# EAGLE board sweef_platine_v5_ohne_masseflaeche (EAGLE 9.6.2)

Size 34.2 x 46.2 mm. Coordinates in mm from the lower left corner, seen from the top.
Outline: 5.6,0 28.6,0 arc90 29.6,1 29.6,8 33.2,8 arc90 34.2,9 34.2,45.2 arc90 33.2,46.2 1,46.2 arc90 0,45.2 0,9 arc90 1,8 4.6,8 4.6,1 arc90 5.6,0
Copper layers (1*16): Top 0.035mm / dielectric 1.5mm / Bottom 0.035mm
Design rules "Fusion Electronics Design Rules": minimum track width 6mil, minimum drill 0.35mm, track to track 6mil, track to pad 6mil, pad to pad 6mil, via to via 6mil, smd to smd 6mil, copper to edge 0.4mm, drill to drill 6mil, minimum pad ring 10mil, minimum via ring 8mil, stop-mask expansion 4mil, vias tented up to drill 9999mil, thermal gap 10mil
Net classes: 0 default: width 0.2 mm, drill 0.3 mm, clearance 0.15 mm; 1 Strom: width 0.3 mm, drill 0.3 mm, clearance 0.15 mm, clearance 0.15 mm to class 0
tRestrict: area 16.6,11.5 to 21.2,24; area -1,-1 to 5,8.4; area 29.2,-1 to 35.2,8.4; area -3,-3 to 0.4,49.2; area 33.8,-3 to 37.2,49.2; area -3,45.8 to 37.2,49.2; area -3,-3 to 37.2,0.4
bRestrict: area 16.6,11.5 to 21.2,24; area -1,-1 to 5,8.4; area 29.2,-1 to 35.2,8.4; area -3,-3 to 0.4,49.2; area 33.8,-3 to 37.2,49.2; area -3,45.8 to 37.2,49.2; area -3,-3 to 37.2,0.4
vRestrict: area 16.6,11.5 to 21.2,24; area -1,-1 to 5,8.4; area 29.2,-1 to 35.2,8.4; area -3,-3 to 0.4,49.2; area 33.8,-3 to 37.2,49.2; area -3,45.8 to 37.2,49.2; area -3,-3 to 37.2,0.4

## Footprints (pad centres in the part's own frame; a part is rotated, then mirrored left to right if it is on the bottom)
C0402 = smd 0.7 x 0.9: 1 -0.65,0; 2 0.65,0
0603-NO = smd 1.075 x 1: 1 -0.85,0; 2 0.85,0
0805-NO = smd 1.3 x 1.5: 1 -0.95,0; 2 0.95,0
SOD-123 = smd 1.2 x 0.7: A 1.85,0; C -1.85,0
PADS_2_AKKU = smd 2 x 1.8: 1 0,1.6; 2 0,-1.6
FPC-24_XUNPU_FPC-05FB-24PH20 = smd 0.3 x 1.2: 1 -5.75,-1.84; 2 -5.25,-1.84; 3 -4.75,-1.84; 4 -4.25,-1.84; 5 -3.75,-1.84; 6 -3.25,-1.84; 7 -2.75,-1.84; 8 -2.25,-1.84; 9 -1.75,-1.84; 10 -1.25,-1.84; 11 -0.75,-1.84; 12 -0.25,-1.84; 13 0.25,-1.84; 14 0.75,-1.84; 15 1.25,-1.84; 16 1.75,-1.84; 17 2.25,-1.84; 18 2.75,-1.84; 19 3.25,-1.84; 20 3.75,-1.84; 21 4.25,-1.84; 22 4.75,-1.84; 23 5.25,-1.84; 24 5.75,-1.84 | smd 2 x 1.8: MNT1@0 -7.3,1.41; MNT2@0 7.3,1.41
PADS_3_TASTER = smd 1.5 x 1.5: 1 -2.54,0; 2 0,0; 3 2.54,0
PADS_2_LS = smd 1.5 x 2: 1 -2,0; 2 2,0
INDUCTOR_3X3 = smd 2.7 x 0.8: P$1 0,1.1; P$2 0,-1.1
R0402 = smd 0.7 x 0.9: 1 -0.65,0; 2 0.65,0
TP_7 = smd 1.3 x 1.3: 1 -7.62,0; 2 -5.08,0; 3 -2.54,0; 4 0,0; 5 2.54,0; 6 5.08,0; 7 7.62,0
XIAO_NRF52840_SMD = smd 2.75 x 2: 1 -8.055,7.325; 2 -8.055,4.785; 3 -8.055,2.245; 4 -8.055,-0.295; 5 -8.055,-2.835; 6 -8.055,-5.375; 7 -8.055,-7.915; 8 8.11,-7.915; 9 8.11,-5.375; 10 8.11,-2.835; 11 8.11,-0.295; 12 8.11,2.245; 13 8.11,4.785; 14 8.11,7.325 | drill 0.9 pad 1.5: 19 -4.445,0.018; 20 -4.445,1.923
BMX280_COMBO = smd 0.725 x 0.35: 1 0.925,0.975; 2 0.925,0.325; 3 0.925,-0.325; 4 0.925,-0.975; 5 -0.925,-0.975; 6 -0.925,-0.325; 7 -0.925,0.325; 8 -0.925,0.975
MSOP8_0.65MM = smd 0.4 x 1.4: 1 -0.975,-2.2; 2 -0.325,-2.2; 3 0.325,-2.2; 4 0.975,-2.2; 5 0.975,2.2; 6 0.325,2.2; 7 -0.325,2.2; 8 -0.975,2.2
LGA12_2X2MM = smd 0.275 x 0.25: 1 -0.75,0.75; 2 -0.75,0.25; 3 -0.75,-0.25; 4 -0.75,-0.75; 7 0.75,-0.75; 8 0.75,-0.25; 9 0.75,0.25; 10 0.75,0.75 | smd 0.25 x 0.275: 5 -0.25,-0.75; 6 0.25,-0.75; 11 0.25,0.75; 12 -0.25,0.75
MSOP10 = smd 0.25 x 1: 1 -1,-2.113; 2 -0.5,-2.113; 3 0,-2.113; 4 0.5,-2.113; 5 1,-2.113; 6 1,2.113; 7 0.5,2.113; 8 0,2.113; 9 -0.5,2.113; 10 -1,2.113
SOT23-5 = smd 0.55 x 1.2: 1 -0.95,-1.3; 2 0,-1.3; 3 0.95,-1.3; 4 0.95,1.3; 5 -0.95,1.3

## Placement (x,y rotation side)
C10  100 nF  [C0402]  24.4,33 270 bottom
C20  4,7 uF  [0603-NO]  12.6,4 90 top
C21  4,7 uF  [0603-NO]  14.6,4 90 top
C22  4,7 uF 25 V  [0805-NO]  16.8,4 90 top
C23  4,7 uF  [0603-NO]  30,24 270 bottom
C24  4,7 uF 25 V  [0805-NO]  27.2,19.2 270 bottom
C30  100 nF  [C0402]  28.6,10 270 bottom
C31  220 nF  [C0402]  22.8,10 270 bottom
C32  100 nF  [C0402]  22.8,12.4 270 bottom
C33  10 uF  [0603-NO]  25.6,13.8 0 bottom
C40  33 nF  [C0402]  2.5,32.5 0 bottom
C41  1 uF  [C0402]  2.5,34 0 bottom
C42  1 uF  [C0402]  5.2,34 0 bottom
C43  1 uF  [C0402]  2,37.8 270 bottom
C44  10 uF  [0603-NO]  9.2,37.8 270 bottom
D1  B5819W  [SOD-123]  23.6,19.6 0 bottom
J1  Akku  [PADS_2_AKKU]  27.95,4 0 bottom
J2  Display-Stecker  [FPC-24_XUNPU_FPC-05FB-24PH20]  17.1,3.25 180 bottom
J3  Taster extern  [PADS_3_TASTER]  6.25,4 270 bottom
J5  Lautsprecher/Piezo  [PADS_2_LS]  4.3,44.85 0 bottom
L1  10 uH  [INDUCTOR_3X3]  23.4,23.6 0 bottom
R1  2,2 kR  [R0402]  29.4,14.6 0 bottom
R2  2,2 kR  [R0402]  29.4,16.2 0 bottom
R10  0,1 R 1 %  [0805-NO]  31.2,32 270 bottom
R20  910 kR  [R0402]  19,4 90 top
R21  100 kR  [R0402]  20.6,4 90 top
R22  1 MR  [R0402]  29.2,27.6 0 bottom
R23  105 kR  [R0402]  29.2,29 0 bottom
R24  100 kR  [R0402]  30,21.2 270 bottom
R30  1 kR  [R0402]  2.5,31 0 bottom
R31  10 kR  [R0402]  5.2,31 0 bottom
R32  10 kR  [R0402]  5.2,32.5 0 bottom
R33  100 kR  [R0402]  3,41.2 0 bottom
R34  0 R  [0603-NO]  6.6,41.55 0 bottom
TP  Testpunkte  [TP_7]  17,43.6 0 bottom
U1  XIAO nRF52840 Sense  [XIAO_NRF52840_SMD]  10.5,17.75 270 bottom
U2  DPS310  [BMX280_COMBO]  31,10 0 bottom
U3  PAM8302A  [MSOP8_0.65MM]  5.6,37.8 0 bottom
U4  LIS2MDL  [LGA12_2X2MM]  25.6,11 0 bottom
U5  INA226  [MSOP10]  27.6,33 270 bottom
U6  TPS61040  [SOT23-5]  26.8,23.6 270 bottom

## Library data of the parts
C10 C20-C24 C30-C33 C40-C44 D1 J1-J3 J5 L1 R1 R2 R10 R20-R24 R30-R34 TP U1-U6 = sweef

## Nets
+3V3: C10.1 C20.1 C30.1 C32.1 C33.1 J2.5 J2.6 R1.1 R2.1 TP.5 U1.12 U2.2 U2.5 U2.6 U2.8 U4.3 U4.9 U4.10 U5.6
AMP_INM: C42.1 U3.4
AMP_INM_R: C42.2 R32.1
AMP_INP: R31.2 U3.3
AMP_OUTP: R34.1 U3.5
BOOST_EIN [Strom]: R24.1 U1.8 U6.4
BOOST_FB: R22.2 R23.1 U6.3
BOOST_SW [Strom]: D1.A L1.P$2 U6.1
GND: C10.2 C20.2 C21.2 C22.2 C23.2 C24.2 C30.2 C31.2 C32.2 C33.2 C40.2 C43.2 C44.2 J1.2 J2.2 J2.3 J2.7 J2.8 J2.10 J2.11 J2.12 J2.MNT1@0 J2.MNT2@0 J3.3 R20.2 R21.2 R23.2 R24.2 R32.2 R33.2 TP.7 U1.13 U1.20 U2.1 U2.7 U3.7 U4.2 U4.6 U4.8 U4.11 U4.12 U5.1 U5.2 U5.7 U6.2
KOMPASS_C1: C31.1 U4.5
KOMPASS_INT: U1.9 U4.7
LS+ [Strom]: J5.1 R34.2
LS- [Strom]: J5.2 U3.8
OLED_IREF: J2.21 R20.1
OLED_RES: J2.9 R21.1 U1.7
OLED_VCOMH: C21.1 J2.22
SCL: J2.13 R2.2 U1.6 U2.4 U4.1 U5.5
SDA: J2.14 R1.2 U1.5 U2.3 U4.4 U5.4
TASTE1: J3.1 U1.1
TASTE2: J3.2 U1.2
TON: R30.1 U1.3
TON_HP: C41.2 R31.1
TON_TP: C40.1 C41.1 R30.2
TP_5V: TP.3 U1.14
TP_ALERT: TP.4 U5.3
TP_D9: TP.1 U1.10
TP_D10: TP.2 U1.11
VBAT_AKKU [Strom]: J1.1 R10.1 U5.10
VBAT_SYS [Strom]: C23.1 C43.1 C44.1 L1.P$1 R10.2 U1.19 U3.6 U5.8 U5.9 U6.5
VERST_EIN [Strom]: R33.1 U1.4 U3.1
VPP_13V: C22.1 C24.1 D1.C J2.23 R22.1 TP.6

## Tracks (layer width: path | path; a pad name or v marks a point on that pad's centre or on a via)
+3V3  (18 unrouted)
AMP_INM  (1 unrouted)
AMP_INM_R  (1 unrouted)
AMP_INP  (1 unrouted)
AMP_OUTP  (1 unrouted)
BOOST_EIN  (2 unrouted)
BOOST_FB  (2 unrouted)
BOOST_SW  (2 unrouted)
GND  (44 unrouted)
KOMPASS_C1  (1 unrouted)
KOMPASS_INT  (1 unrouted)
LS+  (1 unrouted)
LS-  (1 unrouted)
OLED_IREF  (1 unrouted)
OLED_RES  (2 unrouted)
OLED_VCOMH  (1 unrouted)
SCL  (5 unrouted)
SDA  (5 unrouted)
TASTE1  (1 unrouted)
TASTE2  (1 unrouted)
TON  (1 unrouted)
TON_HP  (1 unrouted)
TON_TP  (2 unrouted)
TP_5V  (1 unrouted)
TP_ALERT  (1 unrouted)
TP_D9  (1 unrouted)
TP_D10  (1 unrouted)
VBAT_AKKU  (2 unrouted)
VBAT_SYS  (9 unrouted)
VERST_EIN  (2 unrouted)
VPP_13V  (5 unrouted)

## Text on the board
tDocu: Displayglas vorne 33,9 x 37,3 (Flachbandkabel unten) | Sweef v5
bDocu: Akku 300 mAh hinten 33 x 19,5 x 6 (auf 1,5 mm Schaumstoff, darunter nur flache Teile)